# Allegro board EG2124A_V10_220802.brd
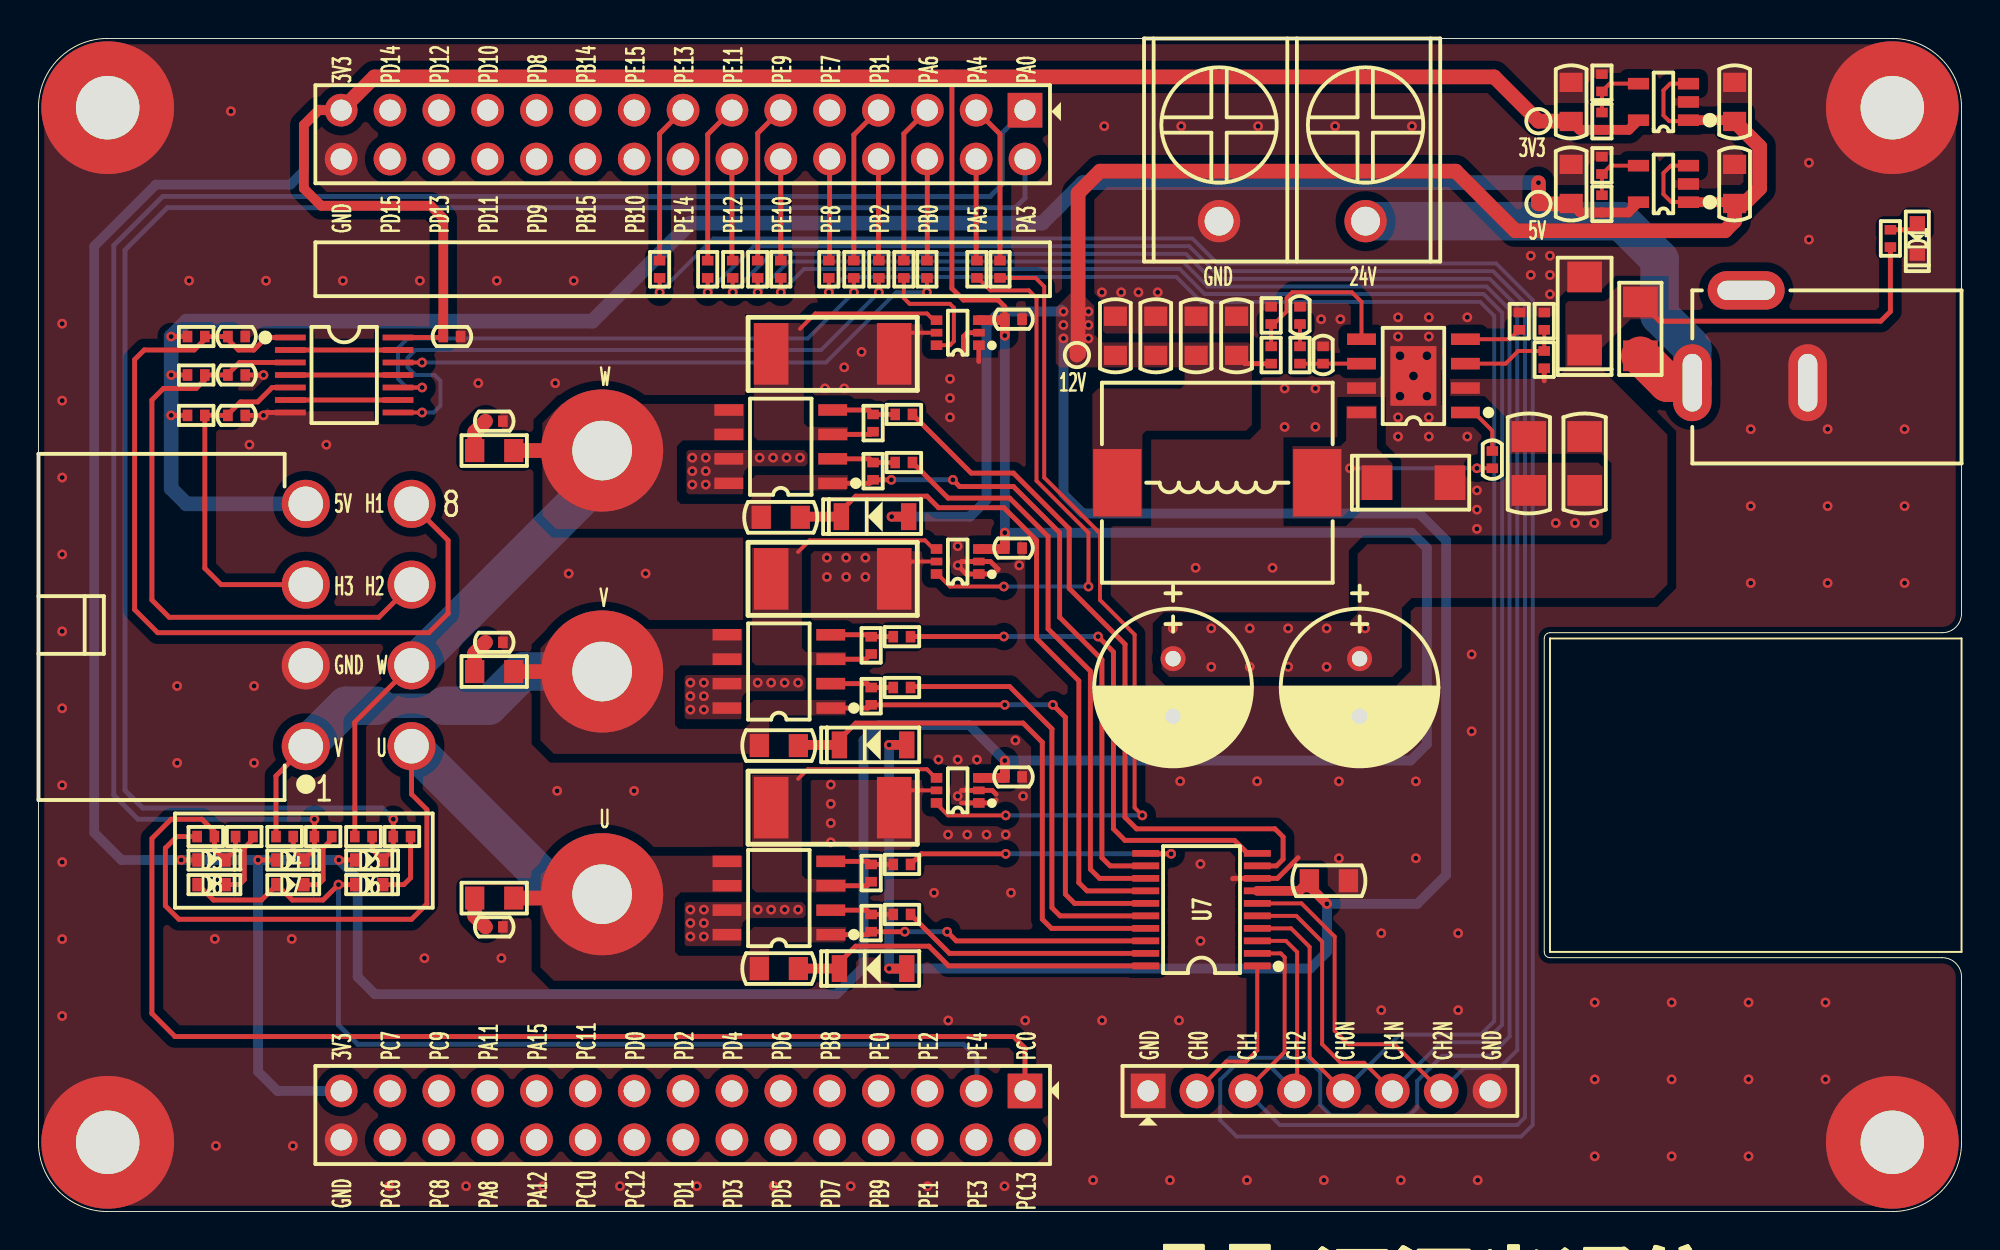
[diagram p0: board, top side]
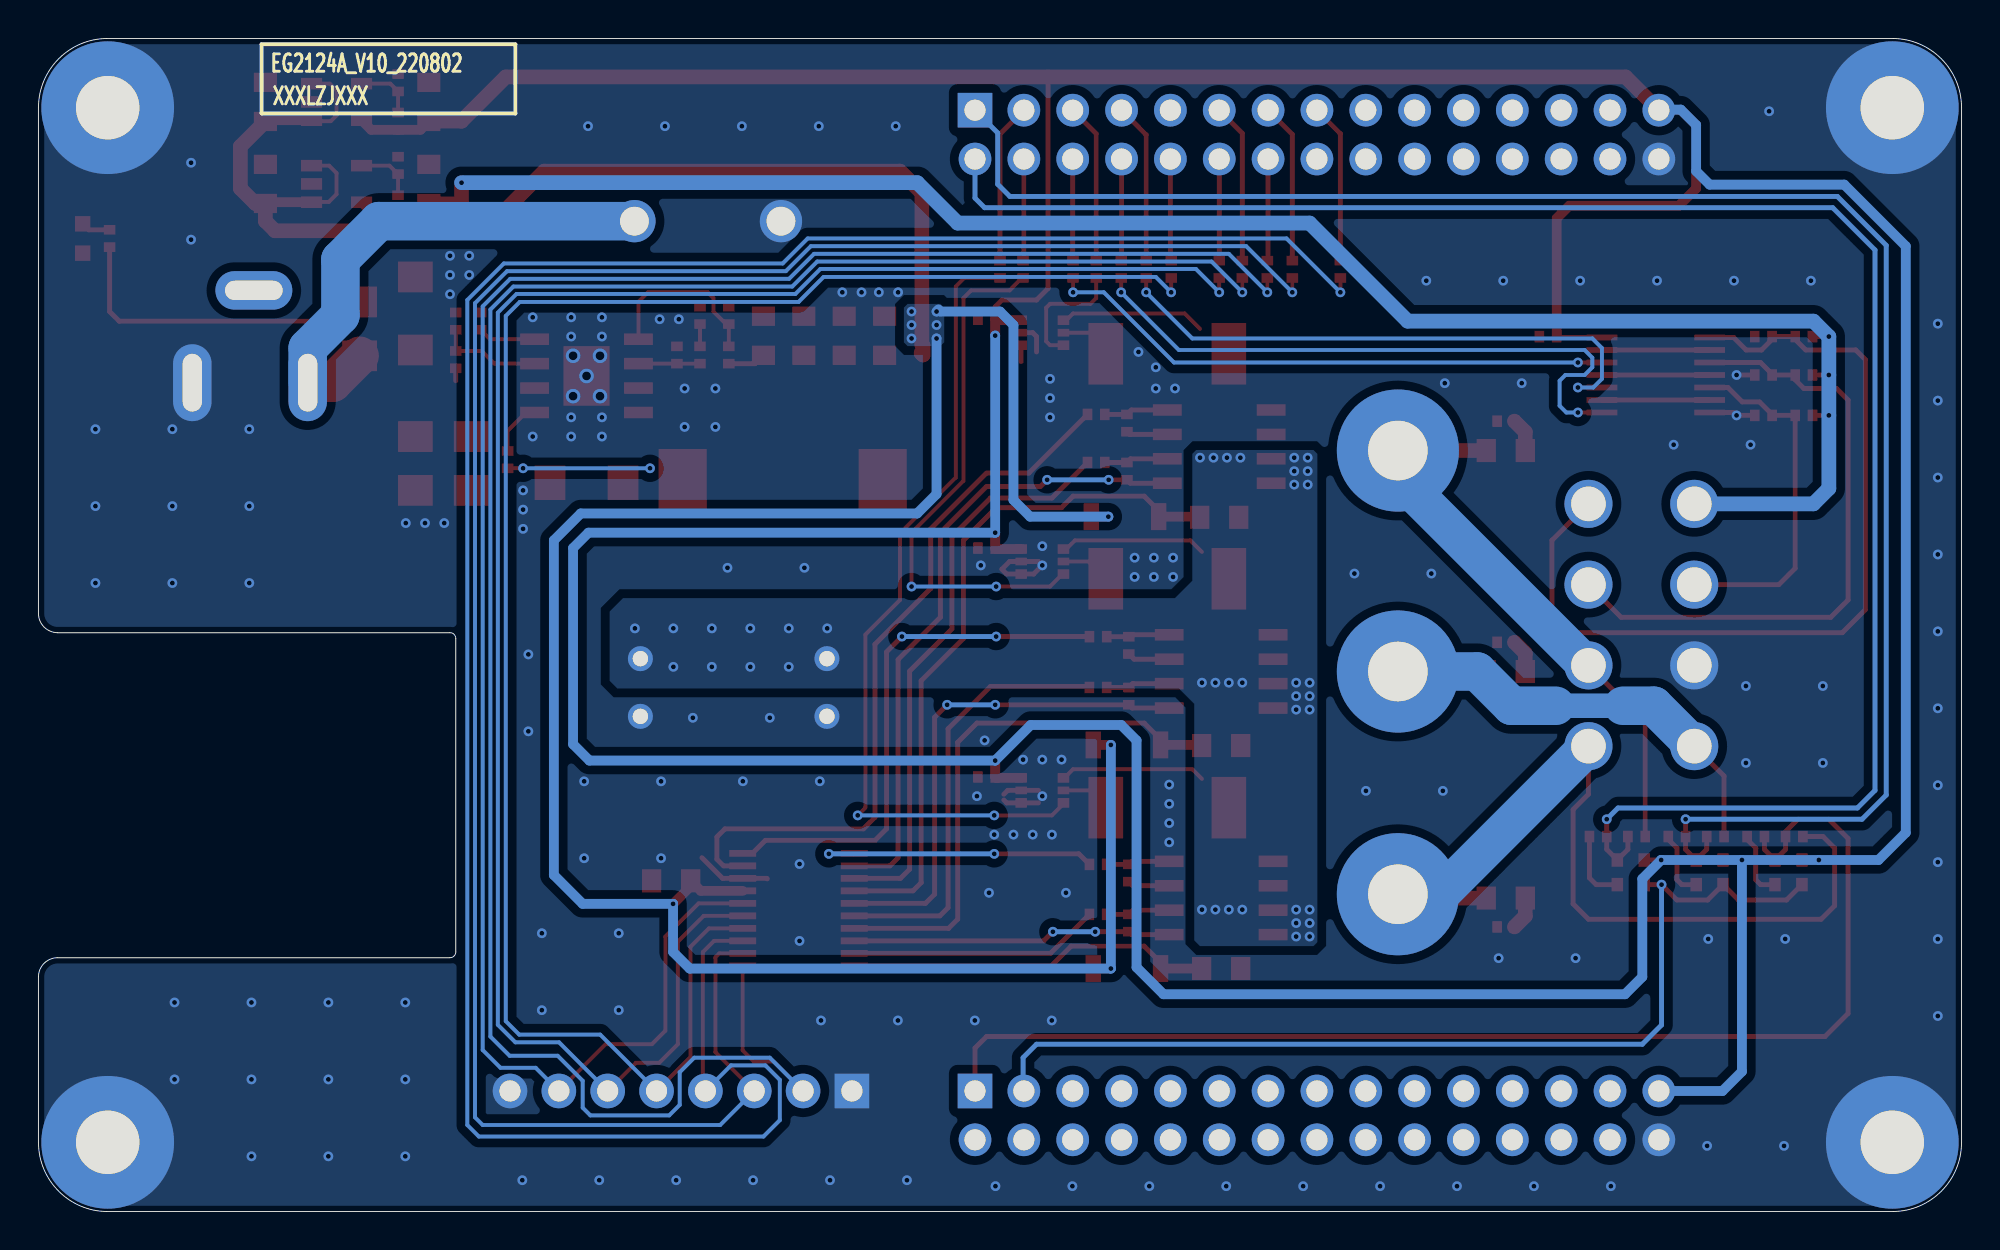
[diagram p1: board, bottom side, seen from below]

Outline 100 x 61 mm; copper layers: TOP, BOTTOM. Coordinates in mm from the lower left corner of the outline.
Outline path: 0,57.4 arc(1.05,59.95) 3.6,61 96.4,61 arc(98.95,59.95) 100,57.4 100,31.1 arc(99.71,30.39) 99,30.1 78.6,30.1 arc(78.39,30.01) 78.3,29.8 78.3,13.5 arc(78.39,13.29) 78.6,13.2 99,13.2 arc(99.71,12.91) 100,12.2 100,3.6 arc(98.95,1.05) 96.4,0 3.6,0 arc(1.05,1.05) 0,3.6 0,57.4

## Design rules (mm)
constraint set DEFAULT: min track width 0.203, pair gap 0.203

## Placement (name value [footprint] x y rotation side)
C1  100nF_50V  [C0402]  10.3 45.5 0 top
C2  100nF_50V  [C0402]  21.5 45.5 0 top
C4  100nF_50V  [C0402]  10.3 43.5 0 top
C7  100nF_50V  [C0402]  50.7 34.5 180 top
C8  100nF_50V  [C0402]  50.7 46.4 0 top
C9  100nF_50V  [C0402]  10.3 41.4 0 top
C10  100uF_50V  [CAP-3R0-8X12]  68.7 27.25 270 top
C12  10uF_25V  [C0805]  79.7 53.44 90 top
C13  10uF_25V  [C0805]  79.7 57.7 90 top
C14  100nF_50V  [C0402]  50.7 22.6 180 top
C16  10uF_25V  [C0805]  88.2 53.44 90 top
C17  10uF_25V  [C0805]  88.2 57.7 90 top
C19  10uF_25V  [C0805]  62.3 45.54 90 top
C21  10uF_25V  [C0805]  58.1 45.54 90 top
C22  10nF_50V  [C0402]  23.7 14.8 0 top
C23  10uF_25V  [C0805]  60.2 45.54 90 top
C24  10uF_25V  [C0805]  56 45.54 90 top
C25  1uF_50V  [C0805]  38.5 24.23 180 top
C26  10nF_50V  [C0402]  65.6 46.6 90 top
C27  47pF_50V  [C0402]  66.8 44.54 90 top
C28  10uF_25V  [C0805]  67.1 17.2 0 top
C29  1uF_50V  [C0805]  38.5 12.63 180 top
C30  1uF_50V  [C0805]  38.6 36.1 180 top
C31  100nF_50V  [C0402]  75.6 39.1 270 top
C32  10uF_50V  [C1206]  77.5 38.9 270 top
C33  10uF_50V  [C1206]  80.4 38.9 270 top
C34  10nF_50V  [C0402]  23.7 41.1 0 top
C36  10nF_50V  [C0402]  23.7 29.6 0 top
C37  100uF_50V  [CAP-3R0-8X12]  59 27.25 270 top
D1  GREEN-0603  [LED0603]  97.7 50.6 270 top
D2  SS56F  [SMAF]  80.4 46.7 270 top
D3  LRB521S-40T1G/NI  [SOD523]  17.2 18.28 180 top
D4  LRB521S-40T1G/NI  [SOD523]  13.1 18.28 180 top
D5  LRB521S-40T1G/NI  [SOD523]  9 18.28 180 top
D6  LRB521S-40T1G/NI  [SOD523]  17.2 17 180 top
D7  LRB521S-40T1G/NI  [SOD523]  13.1 17 180 top
D8  LRB521S-40T1G/NI  [SOD523]  9 17 180 top
D9  1N4148  [SOD123]  43.4 12.63 0 top
D13  1N4148  [SOD123]  43.4 24.27 0 top
D14  SS56F  [SMAF]  71.5 37.9 180 top
D15  1N4148  [SOD123]  43.5 36.13 0 top
DC1  -  [DC005]  92 43.1 180 top
F1  0469005.WR  [FUSE1206]  83.3 45.9 90 top
J1  -  [CN2X15-2P54-Z]  51.3 57.27 180 top
J2  KF7.62-2P  [KF7R62-2P]  65.2 51.5 0 top
J3  -  [HX42003-8WAF]  13.9 30.5 180 top
J4  -  [CN2X15-2P54-Z]  51.3 6.27 180 top
J5  -  [CN1X8-2P54-Z]  57.7 6.27 0 top
L2  SMMS1040-6R8  [L10040]  61.3 37.9 180 top
MH1  HOLE_M3/NI  [HOLE6R90X3R40]  3.6 57.4 0 top
MH2  HOLE_M3/NI  [HOLE6R90X3R40]  96.4 57.4 0 top
MH3  HOLE_M3/NI  [HOLE6R90X3R40]  3.6 3.6 0 top
MH4  HOLE_M3/NI  [HOLE6R90X3R40]  96.4 3.6 0 top
MH5  HOLE_M3/NI  [HOLE6R35X3R10]  29.31 16.5 0 top
MH6  HOLE_M3/NI  [HOLE6R35X3R10]  29.31 28.08 180 top
MH7  HOLE_M3/NI  [HOLE6R35X3R10]  29.31 39.57 180 top
NOREF  -  []  0 0 90 top
NOREF#2  -  []  0 0 90 top
NOREF#3  -  []  0 0 90 top
NOREF#4  -  []  0 0 0 top
NOREF#5  -  []  0 0 0 top
NOREF#6  -  []  0 0 0 top
Q1  NCE6005AS  [SOIC8]  38.5 16.3 90 top
Q2  NCE6005AS  [SOIC8]  38.5 28.08 90 top
Q3  NCE6005AS  [SOIC8]  38.6 39.77 90 top
R1  47K  [R0402]  96.3 50.6 90 top
R2  0R  [R0402]  38.6 49 90 top
R3  0R  [R0402]  36.1 49 90 top
R5  0R  [R0402]  41.1 49 90 top
R11  0R  [R0402]  42.4 49 90 top
R12  0R  [R0402]  43.7 49 90 top
R13  0R  [R0402]  46.2 49 90 top
R14  0R  [R0402]  45 49 90 top
R15  0R  [R0402]  50 49 90 top
R16  0R  [R0402]  48.8 49 90 top
R17  10K  [R0402]  8.2 45.5 180 top
R19  10K  [R0402]  8.2 43.5 180 top
R20  10K  [R0402]  8.2 41.4 180 top
R21  5mR  [R2512]  41.3 32.9 180 top
R22  5mR  [R2512]  41.3 21 180 top
R24  10K  [R0402]  43.3 15 270 top
R25  33R  [R0402]  44.9 15.45 180 top
R27  5mR  [R2512]  41.3 44.6 180 top
R28  10K/NI  [R0402]  16.9 19.5 0 top
R29  2.2K/NI  [R0402]  18.9 19.5 0 top
R30  10K/NI  [R0402]  12.8 19.5 0 top
R31  2.2K/NI  [R0402]  14.8 19.5 0 top
R32  10K/NI  [R0402]  8.7 19.5 0 top
R33  2.2K/NI  [R0402]  10.7 19.5 0 top
R34  0R/NI  [R0402]  37.4 49 90 top
R35  0R/NI  [R0402]  34.8 49 90 top
R36  0R/NI  [R0402]  32.3 49 90 top
R38  33R  [R0402]  44.9 18.05 180 top
R39  10K  [R0402]  43.3 17.6 90 top
R40  1R  [R0805]  23.7 16.3 0 top
R41  14.3K  [R0402]  64.1 46.6 90 top
R43  10K  [R0402]  43.3 26.8 270 top
R44  33R  [R0402]  44.9 27.25 180 top
R48  10K  [R0402]  43.3 29.44 90 top
R49  33R  [R0402]  44.9 29.89 180 top
R52  1R  [R0805]  23.7 28.08 0 top
R53  200K  [R0402]  77 46.3 270 top
R54  10K  [R0402]  43.4 38.5 270 top
R55  33R  [R0402]  45 38.95 180 top
R56  330K  [R0402]  78.3 44.3 270 top
R57  75K  [R0402]  78.3 46.3 270 top
R61  10K  [R0402]  43.4 41 90 top
R62  33R  [R0402]  45 41.45 180 top
R65  1R  [R0805]  23.7 39.57 0 top
R66  200K  [R0402]  64.1 44.54 90 top
R67  10K  [R0402]  65.6 44.54 270 top
R68  33K  [R0402]  81.3 56.7 90 top
R69  63.4K  [R0402]  81.3 52.4 90 top
R70  20K  [R0402]  81.3 58.7 90 top
R71  20K  [R0402]  81.3 54.4 90 top
TP1  TP/NI  [TP-0R75]  78 52.4 270 top
TP2  TP/NI  [TP-0R75]  78 56.7 180 top
TP3  TP/NI  [TP-0R75]  54 44.54 0 top
U2  SN74LVC14APW  [TSSOP14]  15.9 43.5 270 top
U3  INA199A2DCKR  [SOT363]  47.8 33.8 90 top
U4  INA199A2DCKR  [SOT363]  47.8 21.9 90 top
U5  SPX3819M5-L-ADJ  [SOT23-5]  84.5 57.7 90 top
U6  INA199A2DCKR  [SOT363]  47.8 45.7 90 top
U7  EG2124A  [TSSOP20]  60.48 15.7 90 top
U8  TPS54340DDAR  [SOIC8-3R10X2R40]  71.5 43.45 90 top
U9  SPX3819M5-L-ADJ  [SOT23-5]  84.5 53.44 90 top

## Library data of the parts
C1 C2 C4 C9 C22 C34 C36 = CAP NP_2
C7 C8 C14 C25 C28-C30 = CAP NP
C10 C37 = CAPT_100UF_3528_6r3V_10%_LXXXX
C12 C13 C16 C17 C19 C21 C23 C24 C26 C27 C31-C33 = CAP NP_3
D1 = LED_4
D2-D9 D13-D15 = DIODE13_9
DC1 = DC005
F1 = FUSE
J1 J4 = CONN RCPT 15x2
J2 = CONN RCPT 2
J3 = HX30002-10A_1
J5 = CONN RCPT 8
L2 = INDUCTOR_0
MH1-MH7 = Hold_1
Q1-Q3 = IRF7351TRPBF
R1-R3 R5 R11-R17 R19-R22 R24 R25 R27-R36 R38-R41 R43 R44 R48 R49 R52-R57 R61 R62 R65-R71 = R_Generic
TP1-TP3 = TestPoint
U2 = SN74LVC14APW
U3 U4 U6 = INA199A2DCKR
U5 U9 = SPX3819M5-L-1-2
U7 = EG2124A
U8 = TPS54340DDAR

## Footprints (pads in the part's own frame, mm; a bottom-side part is the same pattern mirrored in y, then rotated)
C0402
  rect 0.5x0.6 smd: 1(-0.45,0) 2(0.45,0)
C0805
  rect 1x1.2 smd: 1(-1.016,0) 2(1.016,0)
C1206
  rect 1.6x1.8 smd: 1(-1.4,0) 2(1.4,0)
CAP-3R0-8X12
  round 1.3 hole 0.8: 1(-1.5,0) 2(1.5,0)
CN1X8-2P54-Z
  rect 1.8x1.8 hole 1.1: 1(0,0)
  round 1.8 hole 1.1: 2(2.54,0) 3(5.08,0) 4(7.62,0) 5(10.16,0) 6(12.7,0) 7(15.24,0) 8(17.78,0)
CN2X15-2P54-Z
  rect 1.8x1.8 hole 1.1: 1(0,0)
  round 1.7 hole 1.1: 2(0,2.54) 3(2.54,0) 4(2.54,2.54) 5(5.08,0) 6(5.08,2.54) 7(7.62,0) 8(7.62,2.54) 9(10.16,0) 10(10.16,2.54) 11(12.7,0) 12(12.7,2.54) 13(15.24,0) 14(15.24,2.54) 15(17.78,0) 16(17.78,2.54) 17(20.32,0) 18(20.32,2.54) 19(22.86,0) 20(22.86,2.54) 21(25.4,0) 22(25.4,2.54) 23(27.94,0) 24(27.94,2.54) 25(30.48,0) 26(30.48,2.54) 27(33.02,0) 28(33.02,2.54) 29(35.56,0) 30(35.56,2.54)
DC005
  oval 2x4 hole 1x3: 1(6,0) 2(0,0)
  oval 4x2 hole 3x1: 3(3.2,-4.8)
FUSE1206
  rect 1.6x1.8 smd: 1(-1.4,0) 2(1.4,0)
HOLE6R35X3R10
  round 6.35 hole 3.1: 1(0,0)
HOLE6R90X3R40
  round 6.9 hole 3.3: 1(0,0)
HX42003-8WAF
  round 2.5 hole 1.8: 1(0,6.3) 2(0,2.1) 3(0,-2.1) 4(0,-6.3) 5(-5.5,6.3) 6(-5.5,2.1) 7(-5.5,-2.1) 8(-5.5,-6.3)
KF7R62-2P
  round 2.2 hole 1.5: 1(-3.81,0) 2(3.81,0)
L10040
  rect 2.5x3.5 smd: 1(-5.2,0) 2(5.2,0)
LED0603
  rect 0.8x0.8 smd: 1(-0.762,0) 2(0.762,0)
R0402
  rect 0.5x0.6 smd: 1(-0.45,0) 2(0.45,0)
R0805
  rect 1x1.2 smd: 1(-1.016,0) 2(1.016,0)
R2512
  rect 1.8x3.2 smd: 1(-3.2,0) 2(3.2,0)
SMAF
  rect 1.6x1.8 smd: 1(-1.9,0) 2(1.9,0)
SOD123
  rect 0.8x1.4 smd: 1(1.75,0) 2(-1.75,0)
SOD523
  rect 0.6x0.7 smd: 1(-0.7,0) 2(0.7,0)
SOIC8
  rect 0.6x1.5 smd: 1(-1.9,-2.7) 2(-0.63,-2.7) 3(0.64,-2.7) 4(1.91,-2.7) 5(1.91,2.7) 6(0.64,2.7) 7(-0.63,2.7) 8(-1.9,2.7)
SOIC8-3R10X2R40
  rect 0.6x1.5 smd: 1(-1.9,-2.7) 2(-0.63,-2.7) 3(0.64,-2.7) 4(1.91,-2.7) 5(1.91,2.7) 6(0.64,2.7) 7(-0.63,2.7) 8(-1.9,2.7)
  rect 3.1x2.4 smd: 9(0,0)
SOT23-5
  rect 0.6x1.1 smd: 1(-0.95,-1.3) 2(0,-1.3) 3(0.95,-1.3) 4(0.95,1.3) 5(-0.95,1.3)
SOT363
  rect 0.5x0.6 smd: 1(-0.65,-1.1) 3(0.65,-1.1) 4(0.65,1.1) 6(-0.65,1.1)
  rect 0.4x0.6 smd: 2(0,-1.1) 5(0,1.1)
TP-0R75
  round 0.75 smd: 1(0,0)
TSSOP14
  rect 0.3x1.6 smd: 1(-1.95,-2.8) 2(-1.3,-2.8) 3(-0.65,-2.8) 4(0,-2.8) 5(0.65,-2.8) 6(1.3,-2.8) 7(1.95,-2.8) 8(1.95,2.8) 9(1.3,2.8) 10(0.65,2.8) 11(0,2.8) 12(-0.65,2.8) 13(-1.3,2.8) 14(-1.95,2.8)
TSSOP20
  rect 0.35x1.4 smd: 1(-2.925,-2.9) 2(-2.275,-2.9) 3(-1.625,-2.9) 4(-0.975,-2.9) 5(-0.325,-2.9) 6(0.325,-2.9) 7(0.975,-2.9) 8(1.625,-2.9) 9(2.275,-2.9) 10(2.925,-2.9) 11(2.925,2.9) 12(2.275,2.9) 13(1.625,2.9) 14(0.975,2.9) 15(0.325,2.9) 16(-0.325,2.9) 17(-0.975,2.9) 18(-1.625,2.9) 19(-2.275,2.9) 20(-2.925,2.9)

## Nets
GND: C1.2 C2.2 C4.2 C7.1 C8.2 C9.2 C10.2 C12.2 C13.2 C14.1 C16.2 C17.2 C19.2 C21.2 C22.2 C23.2 C24.2 C26.2 C27.2 C28.2 C32.2 C33.2 C34.2 C36.2 C37.2 D1.2(CATHODE) D2.1 D14.1 DC1.2 J1.30 J2.1 J3.2 J4.30 J5.1 J5.8 MH1.1 MH2.1 MH3.1 MH4.1 R21.1 R22.1 R27.1 R41.2 R53.1 R57.1 R70.2 R71.2 U2.7 U3.1 U3.2 U3.5 U4.1 U4.2 U4.5 U5.2 U6.1 U6.2 U6.5 U7.8 U8.7 U8.9 U9.2
PGND1: Q1.3(S2) R22.2 R39.1 U4.4
PGND2: Q2.3(S2) R21.2 R48.1 U3.4
PGND3: Q3.3(S2) R27.2 R61.1 U6.4
VCC_3.3V: C2.1 C7.2 C8.1 C13.1 C14.2 D3.2(ANODE_2) D4.2(ANODE_2) D5.2(ANODE_2) J1.29 J4.29 R68.1 TP2.1 U2.14(VCC) U3.3(V+) U4.3(V+) U5.5(VOUT) U6.3(V+)
VCC_5V: C12.1 J3.4 R17.2 R19.2 R20.2 R69.1 TP1.1 U9.5(VOUT)
VCC_12V: C16.1 C17.1 C19.1 C21.1 C23.1 C24.1 C28.1 D9.1 D13.1 D15.1 L2.2 R66.1 TP3.1 U5.1 U5.3 U7.7 U9.1 U9.3
VCC_24V: C10.1 C32.1 C33.1 C37.1 D2.2(ANODE_2) F1.2 Q1.7 Q1.8 Q2.7 Q2.8 Q3.7 Q3.8 R1.1 R56.2 U8.2(VIN)
VCC_24V_IN: DC1.1 F1.1 J2.2
CURR_U: R15.1 U4.6
CURR_V: R16.1 U3.6
CURR_W: R14.1 U6.6
H1: C1.1 J3.8 R17.1 U2.1
H2: C4.1 J3.7 R19.1 U2.3
H3: C9.1 J3.3 R20.1 U2.5
HALL_H1: R13.1 U2.12
HALL_H2: R11.1 U2.10
HALL_H3: R12.1 U2.8
HO1: R25.1 U7.19
HO2: R44.1 U7.16
HO3: R55.1 U7.13
LO1: R38.1 U7.11
LO2: R49.1 U7.10
LO3: R62.1 U7.9
MOTOR_U: C29.2 J3.5 MH5.1 Q1.1 Q1.5 Q1.6 R24.2 R32.1 R40.2 U7.18
MOTOR_V: C25.2 J3.1 MH6.1 Q2.1 Q2.5 Q2.6 R30.1 R43.2 R52.2 U7.15
MOTOR_W: C30.2 J3.6 MH7.1 Q3.1 Q3.5 Q3.6 R28.1 R54.2 R65.2 U7.12(VS3)
PA0: D4.1 J1.1 R30.2 R31.1
PA3: D3.1 J1.2 R28.2 R29.1
PA4: J1.3 R15.2
PA5: J1.4 R16.2
PA6: J1.5 R14.2
PA8: J4.24
PA11: J4.23
PA12: J4.22
PA15: J4.21
PB0: J1.6 R13.2
PB1: J1.7 R11.2
PB2: J1.8 R12.2
PB8: J4.9
PB9: J4.8
PB10: J1.18
PB14: J1.19
PB15: J1.20
PC0: D5.1 J4.1 R32.2 R33.1
PC6: J4.28
PC7: J4.27
PC8: J4.26
PC9: J4.25
PC10: J4.20
PC11: J4.19
PC12: J4.18
PC13: J4.2
PD0: J4.17(9)
PD1: J4.16
PD2: J4.15
PD3: J4.14
PD4: J4.13
PD5: J4.12
PD6: J4.11
PD7: J4.10
PD8: J1.21
PD9: J1.22
PD10: J1.23
PD11: J1.24
PD12: J1.25
PD13: J1.26
PD14: J1.27
PD15: J1.28
PE0: J4.7
PE1: J4.6
PE2: J4.5
PE3: J4.4
PE4: D6.2(ANODE_2) D7.2(ANODE_2) D8.2(ANODE_2) J4.3
PE7: J1.9
PE8: J1.10 R5.2
PE9: J1.11 R34.2
PE10: J1.12 R2.2
PE11: J1.13 R35.2
PE12: J1.14 R3.2
PE13: J1.15 R36.2
PE14: J1.16
PE15: J1.17(9)
TIM0_CH0: J5.2 R34.1 U7.1
TIM0_CH0N: J5.5 R5.1 U7.4
TIM0_CH1: J5.3 R35.1 U7.2
TIM0_CH1N: J5.6 R2.1 U7.5
TIM0_CH2: J5.4 R36.1 U7.3
TIM0_CH2N: J5.7 R3.1 U7.6
VB1: C29.1 D9.2(ANODE_2) U7.20
VB2: C25.1 D13.2(ANODE_2) U7.17
VB3: C30.1 D15.2(ANODE_2) U7.14
N17281076: D8.1 R33.2
N17281273: D7.1 R31.2
N17281452: D6.1 R29.2
N17294145: U2.6 U2.9
N17294151: U2.4 U2.11
N17294165: U2.2 U2.13
N17303878: D1.1 R1.2
N17309171: Q1.2 R24.1 R25.2
N17309216: Q1.4 R38.2 R39.2
N17309252: C22.1 R40.1
N17309383: Q2.2 R43.1 R44.2
N17309428: Q2.4 R48.2 R49.2
N17309464: C36.1 R52.1
N17309595: Q3.2 R54.1 R55.2
N17309640: Q3.4 R61.2 R62.2
N17309676: C34.1 R65.1
N17313515: C31.1 U8.1
N17313519: C31.2 D14.2(ANODE_2) L2.1 U8.8
N17313652: R41.1 R66.2 U8.5
N17313680: R56.1 R57.2 U8.3
N17313684: C27.1 R67.2 U8.6
N17313708: R53.2 U8.4
N17313766: C26.1 R67.1
N17315385: R68.2 R70.1 U5.4
N17315397: R69.2 R71.1 U9.4

Pads without a net: DC1 3

## Via types
v1: diameter 0.508, hole 0.254, TOP to BOTTOM, 255 vias
v2: diameter 0.762, hole 0.457, TOP to BOTTOM, 5 vias

## Routing (per net, layer and track width the routed paths; a pad name or vN(x,y) marks a point on that pad's centre or on a via; arc(x,y) is an arc through that point)
GND: length 26.6
  TOP w0.203: R21.1 45.4,33.8 U3.5 ; U4.5 45,21.9 44.5,21.4 R22.1 ; R27.1 44.5,45.2 45,45.7 U6.5
  TOP w0.254: U6.1 48.9,44.2 ; 49.8,21.7 49.6,21.9 U4.2 48,21.9 ; 62.1,17.3 62.12,17.32 U7.8 64.42,17.32 65.5,18.4 ; 48,21.25 U4.1 49.65,21.25 49.8,21.4 ; 48.1,44.7 48.1,45.5 48.3,45.7 U6.2 ; C9.2 v1(11.7,41.4) 11.85,41.55 U2.7 ; C4.2 v1(11.7,43.5) ; U3.1 49.65,33.15 49.9,33.4 49.5,33.8 U3.2 48,33.8 v1(47.8,33.6) 48.25,33.15 U3.1
  vias: v1(1.23,46.17) v1(1.23,42.17) v1(1.23,38.17) v1(1.23,34.17) v1(1.23,30.17) v1(1.23,26.17) v1(1.23,22.17) v1(1.23,18.17) v1(1.23,14.17) v1(1.23,10.17) v1(7.21,27.33) v1(7.21,23.33) v1(7.83,48.4) v1(9.17,14.18) v1(9.23,3.41) v1(10.01,57.21) v1(10.97,39.88) v1(11.21,27.33) v1(11.21,23.33) v1(11.83,48.4) v1(13.17,14.18) v1(13.23,3.41) v1(14.97,39.88) v1(15.83,48.4) v1(18.24,1.32) v1(19.83,48.4) v1(20.07,13.18) v1(22.24,1.32) v1(22.87,43.08) v1(23.83,48.4) v1(24.07,13.18) v1(26.24,1.32) v1(26.87,43.08) v1(26.97,21.88) v1(27.57,33.18) v1(27.83,48.4) v1(30.24,1.32) v1(30.97,21.88) v1(31.57,33.18) v1(34.24,1.32) v1(38.24,1.32) v1(40.9,42.8) v1(41,34) v1(41,33) v1(41.2,22.2) v1(41.2,21.2) v1(41.2,20.2) v1(41.2,19.2) v1(41.9,43.9) v1(41.9,42.8) v1(42,34) v1(42,33) v1(42.24,1.32) v1(42.8,44.7) v1(43,34) v1(43,33) v1(46.24,1.32) v1(46.57,16.58) v1(46.8,23.5) v1(47.3,19.6) v1(47.31,9.94) v1(47.4,43.3) v1(47.4,42.3) v1(47.4,41.3) v1(47.8,34.6) v1(47.8,23.5) v1(47.8,21.6) v1(48.3,19.6) v1(48.8,23.5) v1(49.3,19.6) v1(50.24,1.32) v1(50.3,19.6) v1(50.57,16.58) v1(50.8,24.5) v1(51,33.6) v1(51.2,21.6) v1(51.31,9.94) v1(54.84,1.63) v1(55.3,47.8) v1(55.31,9.94) v1(55.42,56.44) v1(56.3,47.8) v1(57.2,47.8) v1(58.2,47.8) v1(58.84,1.63) v1(59.31,9.94) v1(59.42,56.44) v1(59.37,22.38) v1(60.17,33.48) v1(60.42,18.07) v1(60.42,14.07) v1(61.97,25.68) v1(62.84,1.63) v1(63.42,56.44) v1(63.37,22.38) v1(64.17,33.48) v1(64.8,42.8) v1(64.8,40.8) v1(65.97,25.68) v1(66.4,42.8) v1(66.4,40.8) v1(66.7,46.4) v1(66.84,1.63) v1(67.42,56.44) v1(67.62,22.37) v1(67.62,18.37) v1(67.7,46.4) v1(69.82,14.47) v1(69.82,10.47) v1(70.7,46.5) v1(70.7,45.5) v1(70.7,41.3) v1(70.7,40.3) v1(70.84,1.63) v1(71.42,56.44) v1(71.62,22.37) v1(71.62,18.37) v1(72.3,46.5) v1(72.3,45.5) v1(72.3,41.3) v1(72.3,40.3) v1(73.82,14.47) v1(73.82,10.47) v1(74.3,46.5) v1(74.3,40.3) v1(74.52,28.97) v1(74.52,24.97) v1(74.8,37.5) v1(74.8,36.5) v1(74.8,35.5) v1(74.84,1.63) v1(77.6,49.7) v1(77.6,48.7) v1(78.6,49.7) v1(78.6,48.7) v1(78.6,47.7) v1(78.9,35.8) v1(79.9,35.8) v1(80.9,35.8) v1(80.92,10.87) v1(80.92,6.87) v1(80.92,2.87) v1(84.92,10.87) v1(84.92,6.87) v1(84.92,2.87) v1(88.92,10.87) v1(88.92,6.87) v1(88.92,2.87) v1(89.04,40.68) v1(89.04,36.68) v1(89.04,32.68) v1(92.07,54.54) v1(92.07,50.54) v1(92.92,10.87) v1(92.92,6.87) v1(93.04,40.68) v1(93.04,36.68) v1(93.04,32.68) v1(97.04,40.68) v1(97.04,36.68) v1(97.04,32.68) v2(70.8,44.5) v2(70.8,42.4) v2(71.5,43.45) v2(72.2,44.5) v2(72.2,42.4)
PGND1: length 9.8
  TOP w0.203: 39.5,22.5 40,23 46.2,23 46.65,22.55 U4.4
  TOP w0.254: Q1.3 43.09,16.94 R39.1
PGND2: length 9.8
  TOP w0.203: 39.5,34.3 40.1,34.9 46.1,34.9 46.55,34.45 U3.4
  TOP w0.254: R48.1 43.03,28.72 Q2.3
PGND3: length 9.7
  TOP w0.203: 39.6,45.9 40.4,46.7 46.2,46.7 46.55,46.35 U6.4
  TOP w0.254: R61.1 43.26,40.41 Q3.3
VCC_3.3V: length 311.4
  TOP w0.254: D4.2 v1(11.42,18.28) ; 47.5,59 47.5,48 48.1,47.4 49.9,47.4 50.25,47.05 C8.1 ; C2.1 21,45.45 U2.14 ; D5.2 v1(7.42,18.28) ; D3.2 v1(15.62,18.28)
  TOP w0.508: J1.29 14.57,57.27 13.8,56.5 13.8,53.2 14.7,52.3 20.4,52.3 21.05,51.65 C2.1 ; U4.3 50.2,22.55 C14.2 v1(50.25,23.45) ; v1(50.25,45.55) C8.1 50.2,46.35 U6.3 ; v1(50.25,35.3) C7.2 50.2,34.45 U3.3 ; U5.5 82.7,56.25 R68.1 80.13,56.25 C13.1
  TOP w0.762: C13.1 79.68,56.7 TP2.1 75.7,59 17.47,59 J1.29
  BOTTOM w0.508: v1(11.42,18.28) v1(7.42,18.28) 4.32,18.28 2.9,19.7 2.9,50.2 6.1,53.4 13.1,53.4 13.8,54.1 13.8,56.5 14.6,57.3 15.71,57.3 J1.29 ; v1(11.42,18.28) v1(15.62,18.28) 16.6,17.3 16.6,12.2 17.5,11.3 41.5,11.3 42.9,12.7 42.9,24.5 43.7,25.3 48.4,25.3 v1(50.25,23.45) 71.35,23.45 72.2,24.3 72.2,34.5 71.4,35.3 v1(50.25,35.3) v1(50.25,45.55) ; v1(11.42,18.28) 11.42,7.28 12.43,6.27 J4.29
VCC_5V: length 98.9
  TOP w0.254: R19.2 v1(6.9,43.5) ; R17.2 v1(6.9,45.5) ; R20.2 v1(6.9,41.4)
  TOP w0.508: C12.1 80.17,51.95 R69.1 82.66,51.95 U9.5
  TOP w0.762: v1(78,53.5) TP1.1 79.68,52.4 C12.1
  BOTTOM w0.762: J3.4 7.7,36.8 6.9,37.6 v1(6.9,41.4) v1(6.9,43.5) v1(6.9,45.5) 7.7,46.3 28.8,46.3 33.9,51.4 52.2,51.4 54.3,53.5 v1(78,53.5)
VCC_12V: length 182.7
  TOP w0.203: U5.1 85.75,56.7 84.8,56.7 84.5,57 84.5,58.3 84.85,58.65 U5.3 ; U9.1 85.79,52.5 84.9,52.5 84.5,52.9 84.5,54 84.89,54.39 U9.3
  TOP w0.254: C19.1 62.73,44.09 R66.1
  TOP w0.508: v1(67,16) 66.08,16.92 C28.1 65.56,16.68 U7.7 ; U9.1 88.13,52.49 C16.1 ; D9.1 v1(44.23,12.63) ; D13.1 v1(44.23,24.27) ; D15.1 v1(44.37,36.13) ; U5.1 88.13,56.75 C17.1
  TOP w0.762: TP3.1 54.1,44.64 54,44.74 54,45.02 54.06,45.08 54.06,52.96 55.2,54.1 73.7,54.1 76.8,51 87.7,51 88.2,51.5 C16.1 88.72,52.42 89.5,53.2 89.5,55.38 C17.1
  BOTTOM w0.508: v1(44.23,24.27) v1(44.23,12.63) 66.14,12.63 67,13.5 v1(67,16) 71.7,16 73.2,17.5 73.2,34.9 71.8,36.3 54.31,36.3 53.3,37.31 v1(53.3,45.4) ; v1(44.37,36.13) 48.44,36.13 49.3,37 49.3,46.1 50,46.8 53.1,46.8 53.2,46.9 v1(53.3,46.8)
  vias: v1(53.3,46.1) v1(54.6,46.8) v1(54.6,46.1) v1(54.6,45.4)
VCC_24V: length 17.6
  TOP w0.254: R1.1 96.3,46.8 95.8,46.3 84.3,46.3 F1.2 ; R56.2 78.3,43.2
  vias: v1(33.9,27.5) v1(33.9,26.8) v1(33.9,26.1) v1(33.9,15.7) v1(33.9,15) v1(33.9,14.3) v1(34,39.2) v1(34,38.5) v1(34,37.8) v1(34.6,27.5) v1(34.6,26.8) v1(34.6,26.1) v1(34.6,15.7) v1(34.6,15) v1(34.6,14.3) v1(34.7,39.2) v1(34.7,38.5) v1(34.7,37.8) v1(37.4,27.5) v1(37.4,15.7) v1(37.5,39.2) v1(38.1,27.5) v1(38.1,15.7) v1(38.2,39.2) v1(38.8,27.5) v1(38.8,15.7) v1(38.9,39.2) v1(39.5,27.5) v1(39.5,15.7) v1(39.6,39.2) v1(58.98,30.32) v1(60.98,30.32) v1(60.98,28.32) v1(62.98,30.32) v1(62.98,28.32) v1(64.98,30.32) v1(64.98,28.32) v1(66.98,30.32) v1(66.98,28.32) v1(68.98,30.32)
VCC_24V_IN: length 26.5
  TOP w2: F1.1 84.7,43.1 DC1.1
  BOTTOM w2: J2.2 82.3,51.5 84.3,49.5 84.3,46.6 86,44.9 DC1.1
CURR_U: length 43.1
  TOP w0.203: v1(57.4,20.6) 57,21 57,30 55.2,31.8 55.2,35.27 52.3,38.17 52.3,48.1 51.85,48.55 R15.1 ; v1(50.3,20.6) 47.3,20.6 46.7,21.2 U4.6
  BOTTOM w0.203: v1(50.3,20.6) v1(57.4,20.6)
CURR_V: length 27.8
  TOP w0.203: v1(50.2,32.5) 47.4,32.5 46.75,33.15 U3.6 ; v1(54.6,32.5) 54.6,35.3 51.9,38 51.9,47.5 51.5,47.9 49.5,47.9 48.85,48.55 R16.1
  BOTTOM w0.203: v1(50.2,32.5) v1(54.6,32.5)
CURR_W: length 6.6
  TOP w0.203: U6.6 47.4,45.05 47.6,45.25 47.6,47 47.4,47.2 45.3,47.2 45,47.5 R14.1
H1: length 46
  TOP w0.254: U2.1 11.85,45.45 11.2,44.8 10.4,44.8 9.85,45.35 C1.1 R17.1 8.65,45.35 8.1,44.8 5.5,44.8 5,44.3 5,31.3 6.2,30.1 20.3,30.1 21.3,31.1 21.3,34.9 J3.8
H2: length 33.2
  TOP w0.254: U2.3 10.45,44.15 9.85,43.55 C4.1 R19.1 8.65,43.25 8.2,42.8 6.5,42.8 5.9,42.2 5.9,31.8 6.8,30.9 17.7,30.9 J3.7
H3: length 18.6
  TOP w0.254: U2.5 12.15,42.85 11.4,42.1 10.5,42.1 9.85,41.45 C9.1 R20.1 8.65,33.45 9.5,32.6 J3.3
HALL_H1: length 29.8
  TOP w0.203: U2.12 v1(19.95,44.15) ; R13.1 v1(46.2,47.8)
  BOTTOM w0.203: v1(46.2,47.8) 44.6,47.8 40.95,44.15 v1(19.95,44.15)
HALL_H2: length 29.9
  TOP w0.203: R11.1 v1(42.4,47.8) ; U2.10 v1(19.95,42.85)
  BOTTOM w0.203: v1(42.4,47.8) 40,45.4 19.2,45.4 18.7,44.9 18.7,43.3 19.15,42.85 v1(19.95,42.85)
HALL_H3: length 32.8
  TOP w0.203: U2.8 v1(19.95,41.55) ; R12.1 v1(43.7,47.8)
  BOTTOM w0.203: v1(43.7,47.8) 40.7,44.8 19.6,44.8 19.2,44.4 19.2,43.9 19.6,43.5 20.6,43.5 20.9,43.2 20.9,41.9 20.55,41.55 v1(19.95,41.55)
HO1: length 13.1
  TOP w0.254: U7.19 47.38,13.43 R25.1
HO2: length 22.6
  TOP w0.254: R44.1 45.4,27.3 50.5,27.3 52.7,25.1 52.7,15.8 53.12,15.38 U7.16
HO3: length 29.9
  TOP w0.254: R55.1 47.3,37.1 50.5,37.1 52.5,35.1 52.5,30.3 54.7,28.1 54.7,17.8 55.17,17.32 U7.13
LO1: length 15.1
  TOP w0.254: R38.1 45.9,18.6 v1(50.3,18.6) ; v1(58.9,18.6) 57.6,18.6 U7.11
  BOTTOM w0.254: v1(50.3,18.6) v1(58.9,18.6)
LO2: length 28.1
  TOP w0.254: U7.10 62.88,18.62 62.2,19.3 56.5,19.3 55.9,19.9 55.9,29.1 v1(55.1,29.9) ; v1(50.2,29.9) 45.36,29.9 R49.1
  BOTTOM w0.254: v1(55.1,29.9) v1(50.2,29.9)
LO3: length 38.1
  TOP w0.254: 63.38,17.98 64.38,17.98 64.72,18.32 64.72,19.48 64.3,19.9 57.1,19.9 56.5,20.5 56.5,29.5 53.6,32.4 53.6,35.5 50.7,38.4 48.5,38.4 R62.1
MOTOR_U: length 62.1
  TOP w0.254: R32.1 7.2,19.5 6.6,18.9 6.6,15.9 7.3,15.2 19.4,15.2 20.2,16 20.2,20.9 19.4,21.7 J3.5 ; v1(45.05,14.55) R24.2 43.15,14.4 Q1.1 ; v1(47.25,14.55) 47.73,14.07 U7.18
  TOP w0.762: MH5.1 29.11,16.3 R40.2
  BOTTOM w0.254: v1(47.25,14.55) v1(45.05,14.55)
  BOTTOM w2: J3.5 27.1,16.5 MH5.1
MOTOR_V: length 53.1
  TOP w0.254: U7.15 53.88,16.02 53.4,16.5 53.4,25.7 v1(52.75,26.35) ; R30.1 12.35,22.65 J3.1 ; v1(50.25,26.35) R43.2 43.13,26.18 Q2.1
  TOP w0.762: R52.2 MH6.1
  BOTTOM w0.254: v1(50.25,26.35) v1(52.75,26.35)
  BOTTOM w1.27: 21.1,26.3 17.6,26.3
  BOTTOM w2: J3.1 16,26.3 17.6,26.3 ; MH6.1 25.18,28.08 23.4,26.3 21.1,26.3
MOTOR_W: length 64.5
  TOP w0.254: R28.1 16.45,25.45 J3.6 ; Q3.1 43.22,37.87 R54.2 v1(44.35,38.05) ; v1(47.55,38.05) 47.9,37.7 50.7,37.7 53.1,35.3 53.1,30.9 55.3,28.7 55.3,18.4 55.73,17.98 57.58,17.98
  TOP w0.762: R65.2 MH7.1
  TOP w2: MH7.1 29.31,38.41
  BOTTOM w0.254: v1(44.35,38.05) v1(47.55,38.05)
  BOTTOM w2: J3.6 19.5,28.4 29.31,38.21 MH7.1
PA0: length 95.2
  TOP w0.254: R30.2 13.25,18.83 D4.1 14.35,18.83 R31.1 v1(14.35,20.4)
  BOTTOM w0.254: v1(14.35,20.4) 5.17,20.4 3.92,21.66 3.92,50.24 6.46,52.78 49.48,52.78 50.12,53.42 50.12,56.09 J1.1
PA3: length 96.4
  TOP w0.254: R28.2 17.35,18.83 D3.1 18.45,18.83 R29.1 v1(18.45,20.4)
  BOTTOM w0.254: J1.2 51.3,52.7 50.8,52.2 6.7,52.2 4.5,50 4.5,21.9 5.42,20.98 17.87,20.98 v1(18.45,20.4)
PA4: length 8.3
  TOP w0.254: R15.2 50,56.03 J1.3
PA5: length 5.3
  TOP w0.254: J1.4 48.76,49.49 R16.2
PA6: length 8.3
  TOP w0.254: J1.5 45,56.05 R14.2
PB0: length 5.3
  TOP w0.254: R13.2 46.22,49.47 J1.6
PB1: length 8.4
  TOP w0.254: J1.7 42.4,55.99 R11.2
PB2: length 5.3
  TOP w0.254: J1.8 43.68,49.47 R12.2
PC0: length 64.6
  TOP w0.254: J4.1 51.3,8.5 50.7,9.1 7.1,9.1 5.9,10.3 5.9,19.4 6.9,20.4 8.5,20.4 9.15,19.75 R32.2 9.15,18.83 D5.1 10.25,18.83 R33.1
PE4: length 52.5
  TOP w0.254: D8.2 9.1,16.2 11.6,16.2 D7.2 13.2,16.2 14.8,16.2 v1(15.6,17) D6.2
  BOTTOM w0.254: J4.3 48.8,6.31 48.8,8 48.1,8.7 16.6,8.7 15.6,9.7 v1(15.6,17)
PE8: length 5.3
  TOP w0.254: J1.10 41.14,49.49 R5.2
PE9: length 8.3
  TOP w0.254: R34.2 37.4,56.07 J1.11
PE10: length 5.3
  TOP w0.254: R2.2 J1.12
PE11: length 8.3
  TOP w0.254: J1.13 34.8,56.01 R35.2
PE12: length 5.3
  TOP w0.254: R3.2 36.06,49.49 J1.14
PE13: length 8.3
  TOP w0.254: R36.2 32.3,56.05 J1.15
TIM0_CH0: length 109.5
  TOP w0.203: R34.1 v1(37.4,47.8) ; 63.38,12.78 63.38,8.38 62.8,7.8 61.77,7.8 J5.2
  BOTTOM w0.203: v1(37.4,47.8) 39,49.4 59.5,49.4 60.8,48.1 75.3,48.1 76.5,46.9 76.5,9.1 75.5,8.1 73,8.1 71.7,6.8 71.7,5.4 71.3,5 67.2,5 66.66,5.54 66.66,7.24 65.9,8 61.97,8 J5.2
TIM0_CH0N: length 93.9
  TOP w0.203: U7.4 65.14,14.72 66.1,13.76 66.1,8.03 J5.5 ; R5.1 v1(41.1,47.8)
  BOTTOM w0.203: v1(41.1,47.8) 41.9,48.6 59.17,48.6 60.47,47.3 74.97,47.3 75.7,46.57 75.7,9.9 75,9.2 70.79,9.2 J5.5
TIM0_CH1: length 112.5
  TOP w0.203: R35.1 v1(34.8,47.8) ; J5.3 64.8,8.29 64.8,13.22 64.6,13.43 U7.2
  BOTTOM w0.203: v1(34.8,47.8) 37.2,50.2 59.83,50.2 61.13,48.9 75.63,48.9 77.3,47.23 77.3,4.9 76.9,4.5 64.55,4.5 J5.3
TIM0_CH1N: length 97.8
  TOP w0.203: R2.1 v1(38.6,47.8) ; U7.5 65.41,15.38 66.75,14.03 66.75,8.7 67.72,7.73 68.94,7.73 J5.6
  BOTTOM w0.203: v1(38.6,47.8) 39.81,49.01 59.34,49.01 60.64,47.71 75.14,47.71 76.11,46.74 76.11,9.71 75.2,8.8 72.93,8.8 J5.6
TIM0_CH2: length 124.8
  TOP w0.203: R36.1 v1(32.3,47.8) ; U7.3 64.87,14.07 65.45,13.49 65.45,6.4 J5.4
  BOTTOM w0.203: J5.4 63.99,7.6 62.2,7.6 61.45,6.85 61.45,4.75 62.3,3.9 77.1,3.9 77.7,4.5 77.7,47.4 75.8,49.3 61.3,49.3 60,50.6 35.1,50.6 v1(32.3,47.8)
TIM0_CH2N: length 103.5
  TOP w0.203: U7.6 65.67,16.02 67.4,14.3 67.4,9.4 68.1,8.7 70.51,8.7 J5.7 ; R3.1 v1(36.1,47.8)
  BOTTOM w0.203: v1(36.1,47.8) 38.1,49.8 59.67,49.8 60.97,48.5 75.47,48.5 76.9,47.07 76.9,8.4 75.97,7.47 74.14,7.47 J5.7
VB1: length 19.2
  TOP w0.254: D9.2 41.65,12.95 42.5,13.8 46.3,13.8 47.33,12.78 57.58,12.78
  TOP w0.508: D9.2 C29.1
VB2: length 28.5
  TOP w0.254: U7.17 52.67,14.72 52.2,15.2 52.2,24.4 51.2,25.4 42.5,25.4 41.65,24.55 D13.2
  TOP w0.508: C25.1 39.55,24.27 D13.2
VB3: length 36.2
  TOP w0.254: U7.14 54.52,16.68 54.1,17.1 54.1,27.6 51.9,29.8 51.9,34.9 50.2,36.6 46.8,36.6 46.2,37.2 42.5,37.2 41.75,36.45 D15.2
  TOP w0.508: C30.1 39.65,36.13 D15.2
N17281076: length 3.5
  TOP w0.254: D8.1 10.45,17 10.7,17.25 10.7,18.9 11.15,19.35 R33.2
N17281273: length 3.5
  TOP w0.254: D7.1 14.55,17 14.8,17.25 14.8,18.9 15.25,19.35 R31.2
N17281452: length 3.7
  TOP w0.254: D6.1 19,17 19.35,17.35 R29.2
N17294145: length 5.6
  TOP w0.254: U2.6 U2.9
N17294151: length 5.6
  TOP w0.254: U2.4 U2.11
N17294165: length 5.6
  TOP w0.254: U2.2 U2.13
N17303878: length 1.5
  TOP w0.254: R1.2 97.39,51.05 D1.1
N17309171: length 3.3
  TOP w0.254: R25.2 R24.1 43.08,15.67 Q1.2
N17309216: length 3.3
  TOP w0.254: Q1.4 43.14,18.21 R39.2 R38.2
N17309252: length 1.7
  TOP w0.762: C22.1 22.68,15.37 R40.1
N17309383: length 3.3
  TOP w0.254: R44.2 R43.1 43.1,27.45 Q2.2
N17309428: length 3.3
  TOP w0.254: Q2.4 43.2,29.99 R48.2 R49.2
N17309464: length 1.8
  TOP w0.762: R52.1 22.68,29.03 C36.1
N17309595: length 3.3
  TOP w0.254: Q3.2 43.21,39.14 R54.1 R55.2
N17309640: length 3.3
  TOP w0.254: R62.2 R61.2 43.17,41.68 Q3.4
N17309676: length 1.8
  TOP w0.762: C34.1 22.68,40.53 R65.1
N17313515: length 2.8
  TOP w0.203: C31.1 75.6,40.6 74.65,41.55 U8.1
N17313519: length 7.4
  TOP w0.203: C31.2 v1(74.8,38.65)
  BOTTOM w0.203: v1(74.8,38.65) v1(68.2,38.65)
N17313652: length 9.1
  TOP w0.203: R66.2 R41.1 64.25,46.15 64.9,46.8 64.9,47.5 65.2,47.8 68.3,47.8 68.8,47.3 U8.5
N17313680: length 5.5
  TOP w0.203: U8.3 76.29,44.09 76.95,44.75 R56.1 R57.2
N17313684: length 3.2
  TOP w0.203: U8.6 C27.1 R67.2
N17313708: length 3
  TOP w0.203: R53.2 76.51,45.36 U8.4
N17313766: length 1.2
  TOP w0.203: R67.1 C26.1
N17315385: length 3.2
  TOP w0.203: U5.4 81.7,58.65 R70.1 R68.2
N17315397: length 3.2
  TOP w0.203: R69.2 R71.1 81.31,53.95 81.74,54.39 U9.4

## Copper pours and planes (outline as drawn; the poured copper is in the pictures)
GND on TOP: 0.3,57.4 1.27,59.73 3.6,60.7 96.4,60.7 98.73,59.73 99.7,57.4 99.7,31.1 99.49,30.61 99,30.4 78.6,30.4 78.18,30.22 78,29.8 78,13.5 78.18,13.08 78.6,12.9 99,12.9 99.49,12.69 99.7,12.2 99.7,3.6 98.73,1.27 96.4,0.3 3.6,0.3 1.27,1.27 0.3,3.6 ; 37 cut-outs
GND on BOTTOM: 0.3,57.4 1.27,59.73 3.6,60.7 96.4,60.7 98.73,59.73 99.7,57.4 99.7,31.1 99.49,30.61 99,30.4 78.6,30.4 78.18,30.22 78,29.8 78,13.5 78.18,13.08 78.6,12.9 99,12.9 99.49,12.69 99.7,12.2 99.7,3.6 98.73,1.27 96.4,0.3 3.6,0.3 1.27,1.27 0.3,3.6 ; 41 cut-outs
PGND1 on TOP: 37.1,22.7 37.1,16.8 37.3,16.6 42,16.6 42,17.3 39.9,17.3 39.7,17.5 39.7,22.5 39.5,22.7
PGND2 on TOP: 37.1,34.5 37.1,28.6 37.3,28.4 42,28.4 42,29.1 39.9,29.1 39.7,29.3 39.7,34.3 39.5,34.5
PGND3 on TOP: 37.2,46.2 37.2,40.3 37.4,40.1 42.1,40.1 42.1,40.8 40,40.8 39.8,41 39.8,46 39.6,46.2
VCC_12V on TOP: 54.8,36.1 54.8,42.5 55.1,42.8 59.4,42.8 59.6,43 59.6,43.7 59.4,43.9 53.1,43.9 52.9,44.1 52.9,47 53.7,47.8 54.2,47.8 54.9,47.1 54.9,45.6 55.3,45.2 62.9,45.2 63.1,45 63.1,40.9 62.8,40.6 57.6,40.6 57.4,40.4 57.4,36.1
VCC_12V on BOTTOM: 53.1,47.2 54.8,47.2 55,47 55,45.2 54.8,45 53.1,45 52.9,45.2 52.9,47
VCC_24V on TOP: 33.7,27.9 39.7,27.9 39.9,27.7 39.9,27.2 39.7,27 36.8,27 36.6,26.8 36.6,25.7 36.5,25.6 33.7,25.6 33.6,25.7 33.6,27.8
VCC_24V on TOP: 84,31.9 71.4,31.9 70.9,31.4 70.9,28.3 70.4,27.8 58.8,27.8 58.4,28.2 58.4,30.4 58.7,30.7 68.2,30.7 68.6,31.1 68.6,34.2 69.1,34.7 81.5,34.7 81.8,35 81.8,38.9 81.3,39.4 76.5,39.4 76.5,41.1 75.2,42.4 73.4,42.4 73.4,43.3 78.9,43.3 79.4,43.8 79.4,47.2 79.6,47.4 81.4,47.4 82.2,48.2 84.3,48.2 84.3,46.4 82.8,46.4 81.3,44.9 81.3,43.8 84.7,40.4 84.7,32.6
VCC_24V on TOP: 33.8,39.6 39.8,39.6 40,39.4 40,38.9 39.8,38.7 36.9,38.7 36.7,38.5 36.7,37.4 36.6,37.3 33.8,37.3 33.7,37.4 33.7,39.5
VCC_24V on TOP: 33.7,16.1 39.7,16.1 39.9,15.9 39.9,15.4 39.7,15.2 36.8,15.2 36.6,15 36.6,13.9 36.5,13.8 33.7,13.8 33.6,13.9 33.6,16
VCC_24V on BOTTOM: 33.5,39.4 33.5,14 33.7,13.8 39.6,13.8 39.9,14.1 39.9,26.4 40.7,27.2 69.9,27.2 70.3,27.6 70.3,31.2 69.6,31.9 40.9,31.9 40,32.8 40,39.4 39.8,39.6 33.7,39.6
MOTOR_U on TOP: 36.6,16.6 33.4,16.6 33.1,16.3 33.1,13.5 33.3,13.3 36.7,13.3 37,13.6 37,14.6 37.2,14.8 42,14.8 42,14 38.1,14 38,13.9 38,12 26.8,12 26.1,12.7 26.1,17.5 27.1,18.5 36.6,18.5
MOTOR_V on TOP: 36.6,28.4 33.4,28.4 33.1,28.1 33.1,25.3 33.3,25.1 36.7,25.1 37,25.4 37,26.4 37.2,26.6 42,26.6 42,25.8 38.1,25.8 38,25.7 38,23.8 26.8,23.8 26.1,24.5 26.1,29.3 27.1,30.3 36.6,30.3
MOTOR_W on TOP: 36.7,40.1 33.5,40.1 33.2,39.8 33.2,37 33.4,36.8 36.8,36.8 37.1,37.1 37.1,38.1 37.3,38.3 42.1,38.3 42.1,37.5 38.2,37.5 38.1,37.4 38.1,35.5 26.9,35.5 26.2,36.2 26.2,41 27.2,42 36.7,42
N17313519 on TOP: 65.2,39.8 67.7,39.8 68,40.1 68,41.9 69.6,41.9 69.6,39.7 70.4,38.9 70.4,37 68.7,37 67.8,36.1 65.2,36.1

## Text on the board
Ref Des/Silkscreen Bottom: XXXLZJXXX | EG2124A_V10_220802
Ref Des/Silkscreen Top: 5V | H3 | GND | V | H1 | H2 | W | U | 12V | 24V | 3V3 | PD14 | PD15 | PC7 | PC6 | PD12 | PD13 | PC9 | PC8 | PD10 | PD11 | PA11 | PA8 | PD8 | PD9 | PA15 | PA12 | PB14 | PB15 | PC11 | PC10 | PE15 | PB10 | PD0 | PC12 | PE13 | PE14 | PD2 | PD1 | PE11 | PE12 | PD4 | PD3 | PE9 | PE10 | PD6 | PD5 | PE7 | PE8 | PB8 | PD7 | PB1 | PB2 | PE0 | PB9 | PA6 | PB0 | PE2 | PE1 | PA4 | PA5 | PE4 | PE3 | PA0 | PA3 | PC0 | PC13 | CH0 | CH1 | CH2 | CH0N | CH1N | CH2N
DISPLAY_TOP: FIGURE | FINISHED_SIZE | 0.254 | 0.4572 | 0.8 | 1.1 | 1.5 | 1.8 | 3.1 | 3.3 | 3.0x1.0 | DRILL CHART: TOP to BOTTOM | ALL UNITS ARE IN MILLIMETERS | ROTATION | - | 0.000 | 90.000 | PLATED | QTY | 255 | 5 | 4 | 68 | 2 | 8 | 3 | 1 | 352 | TOTAL HOLES:
